# Altium PCB PIXRACER-R12.PcbDoc (part 2 of 2)
Units mm, origin at the board's own origin, x right, y up, seen from the top; angles counter-clockwise.
Board outline 36 x 36 mm, 4 copper layers (TOP, 2, 3, BOT), stack 1.492 mm thick; 137 components, 127 nets, 565 pads, 429 vias.
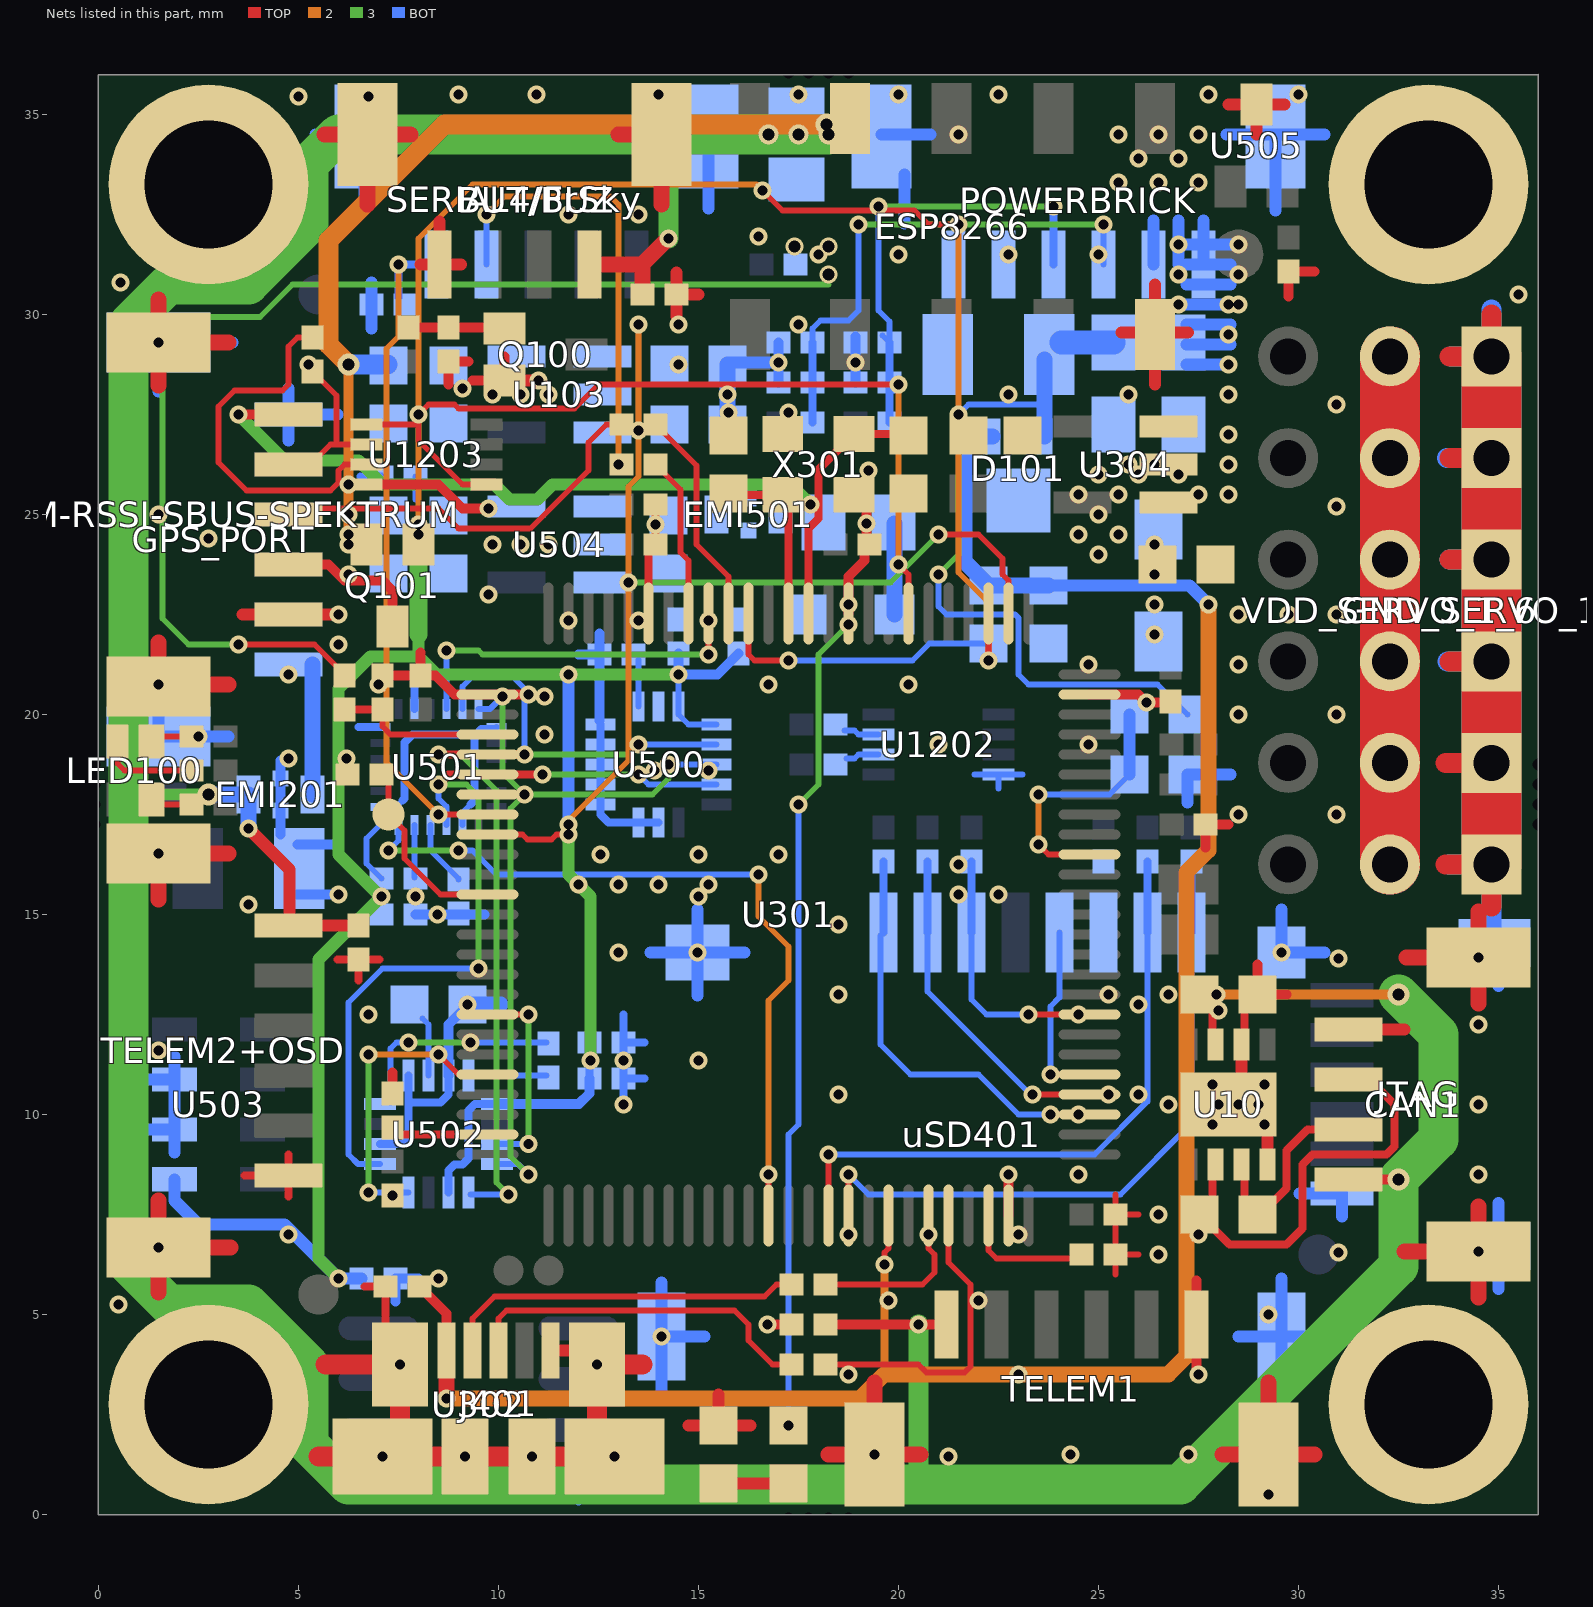
[diagram p4: the nets of this part, all layers, seen from the top]

## Via types
v1: diameter 0.45, hole 0.25, TOP to 2, tented both sides, 172 vias
v2: diameter 0.45, hole 0.25, 3 to BOT, tented bottom, 122 vias
v3: diameter 0.45, hole 0.25, TOP to BOT, tented both sides, 96 vias
v4: diameter 0.45, hole 0.25, TOP to 2, tented top, 10 vias
v5: diameter 0.45, hole 0.25, 3 to BOT, tented both sides, 9 vias
v6: diameter 0.45, hole 0.25, 3 to BOT, 6 vias
v7: diameter 0.45, hole 0.3, 3 to BOT, tented bottom, 3 vias
v8: diameter 0.45, hole 0.25, TOP to BOT, tented top, 3 vias
v9: diameter 0.5, hole 0.3, 3 to BOT, tented bottom, 3 vias
v10: diameter 0.55, hole 0.3, TOP to BOT, tented both sides, 3 vias
v11: diameter 0.55, hole 0.3, 3 to BOT, tented bottom, 1 vias
v12: diameter 0.55, hole 0.3, TOP to 2, tented top, 1 vias

## Nets (pads, with @x,y where several pads share a name; then routed paths per layer and width w, separated by ;. In a path a pad name is that pad's centre, name@x,y a point inside that pad or via, vN(x,y) a via of type N, cw(c..) or ccw(c..) an arc to the next point about the centre after c; other vN are vias at no path point) (continued)
GND: BUT/BUZ.GND C103.1 C105.1 C118.1 C119.1 C120.1 C301.1 C302.1 C303.1 C304.2 C305.2 C310.1 C311.1 C312.1 C313.1 C314.1 C315.1 C316.1 C317.1 C319.1 C320.1 C401.1 C402.2 C403.2 C404.1 C405.2 C501.1 C502.1 C503.1 C505.1 C508.1 C509.1 C510.1 C511.1 C520.1 C521.1 C523.1 C524.1 C525.1 C526.1 C601.2 C602.2 C603.2 CAN1.4 CAN1.GND EMI201.3 EMI201.4 EMI501.3 EMI501.4 ESP8266.2 G1.1 G2.1 G3.1 G4.1 GND_SERVO_1_6.1 GND_SERVO_1_6.2 GND_SERVO_1_6.3 GND_SERVO_1_6.4 GND_SERVO_1_6.5 GND_SERVO_1_6.6 GPS_PORT.6 GPS_PORT.GND J401.5 J401.6 J401.7 JTAG.6 JTAG.GND POWERBRICK.5 POWERBRICK.6 POWERBRICK.GND PPM-RSSI-SBUS-SPEKTRUM.5 PPM-RSSI-SBUS-SPEKTRUM.GND Q100.2 R104.1 R105.2 R118.1 R131.2 R140.1 R301.2 R302.1 R318.1 R404.2 R407.2 R408.2 R431.2 R502.1 SERIAL4/FrSky.4 SERIAL4/FrSky.GND TELEM1.6 TELEM1.GND TELEM2+OSD.6 TELEM2+OSD.GND TVS103.1 U10.2 U10.8 U10.EP U103.2 U301.10 U301.20 U301.27 U301.74 U301.99 U302.4 U304.2 U500.7 U500.8 U500.9 U500.10 U500.11 U500.12 U500.13 U500.15 U501.11 U501.18 U501.20 U502.6 U502.9 U502.11 U503.2 U503.3 U504.2 U505.3 U1202.4 U1203.4 uSD401.6 uSD401.GND X301.2 X301.4 | length 294.9
  TOP w0: 1.5,28.225 v4(1.5,29.3)
  TOP w0.15: 25.425,6 C311.1@25.425,7.5 ; C305.2@25.425,6.5 26,6.5 ; 25.425,8 C311.1@25.425,7.5 ; 26,7.5 C311.1@25.425,7.5
  TOP w0.2: 3.65,8.475 TELEM2+OSD.6@4.75,8.475 ; 4.75,7.95 TELEM2+OSD.6@4.75,8.475 ; 4.75,9 TELEM2+OSD.6@4.75,8.475 ; 5.975,13.875 C602.2@6.5,13.875 ; 6.5,13.35 C602.2@6.5,13.875 ; 6.65,5.7 C401.1@7.175,5.7 J401.6@7.175,4.7 ; 7.025,13.875 C602.2@6.5,13.875 ; U301.20@13.75,22.525 C316.1@13.75,24.1 ; C316.1@13.925,24.25 C315.1@13.925,25.25 ; U10.2@28.65,12.089 C404.1@28.65,12.6
  TOP w0.25: U1203.4@6.7,25.75 8.5,25.75 9.1,25.15 v1(9.75,25.15) ; R431.2@7.1,20.975 8.425,20.975 8.9,20.5 U301.27@9.725,20.5 v1(10.75,20.5) ; C304.2@7.35,10.525 7.35,11.05 ; C312.1@8.05,20.975 8.05,21.55 ; 8.75,28.25 R131.2@8.75,28.825 9.25,28.825 ; 9.35,28.35 Q100.2@10.15,28.35 ; Q100.2@10,28.35 Q100.2@10.15,28.35 ; 10.15,28.95 Q100.2@10.15,28.35 ; v1(16.725,4.75) C603.2@17.325,4.75 ; U301.10@18.75,22.525 18.75,23.45 19.15,23.85 C313.1@19.15,24 ; C313.1@19.2,24.45 X301.2@19.2,25.1 ; U301.74@22.75,7.475 v3@22.75,8.45 ; U301.99@24.775,20.5 26,20.5 v1(26.2,20.3) C310.1@26.8,20.3 ; 27.45,3.65 27.45,5.85 ; 27.675,16.675 R301.2@27.675,17.25 28.25,17.25 ; 28.975,13.75 C404.1@28.975,13 29.7,13 ; 29.75,30.45 C505.1@29.75,31.075 30.4,31.075
  TOP w0.3: 3.6,22.5 v1(6,22.5) ; 8.05,31.25 9.063,31.25 ; SERIAL4/FrSky.4@8.525,31.25 8.525,32.325 ; Q100.2@10.15,28.35 v1(11,28.35) ; J401.5@11.3,4.1 J401.6@12.112,4.1 ; v1@14.45,29.95 14.45,31.05 ; C601.2@14.45,30.5 15,30.5 ; 14.75,2.225 16.3,2.225 ; R140.1@15.5,2.225 15.5,3 ; 25.58,29.55 27.24,29.55 ; 26.41,28.25 ESP8266.2@26.41,29.5 26.41,30.75 ; 28.25,35.25 U505.3@28.95,35.25 ; U10.EP@28.575,10.575 U10.2@28.575,11.75 ; 28.95,34.5 U505.3@28.95,35.25 ; U10.8@29.225,8.75 U10.EP@29.225,9.55 ; 29.65,35.25 U505.3@28.95,35.25 ; CAN1.4@31.25,12.125 32.65,12.125
  TOP w0.4: 1.5,5.55 1.5,7.85 ; v1(1.5,6.675) 3.3,6.675 ; 1.5,15.375 v1(1.5,16.525) 3.25,16.525 ; 1.5,21.8 v4(1.5,20.75) 3.25,20.75 ; 1.5,28.225 v4(1.5,29.3) ; 1.5,30.375 v4(1.5,29.3) ; 3.25,29.3 v4(1.5,29.3) ; 5.65,34.5 SERIAL4/FrSky.GND@6.725,34.5 ; 6.725,32.75 SERIAL4/FrSky.GND@6.725,34.5 ; 7.8,34.5 SERIAL4/FrSky.GND@6.725,34.5 ; 13,34.5 SERIAL4/FrSky.GND@14.075,34.5 14.075,32.75 ; 18.25,1.5 v1(19.4,1.5) ; 19.4,3.3 v1(19.4,1.5) ; 20.55,1.5 v1(19.4,1.5) ; 28.1,1.5 TELEM1.GND@29.25,1.5 ; 29.25,3.3 TELEM1.GND@29.25,1.5 ; 30.4,1.5 TELEM1.GND@29.25,1.5 ; 32.65,6.575 v3(34.5,6.575) ; 32.7,13.925 v3(34.5,13.925) ; 34.5,5.425 34.5,7.7 ; 34.5,12.775 v3(34.5,13.925) ; 34.5,15.075 v3(34.5,13.925)
  TOP w0.5: 5.5,1.45 v1(12.9,1.45) ; 5.675,3.75 v1(7.538,3.75) J401.7@7.538,1.887 ; J401.7@12.462,1.887 v1(12.462,3.75) 13.6,3.75 ; 33.673,16.25 GND_SERVO_1_6.1@34.823,16.25 34.823,15.2 ; 33.673,18.79 GND_SERVO_1_6.2@34.823,18.79 ; 33.77,21.33 GND_SERVO_1_6.3@34.823,21.33 ; 33.77,23.87 GND_SERVO_1_6.4@34.823,23.87 ; 33.77,26.41 GND_SERVO_1_6.5@34.823,26.41 ; 33.77,28.95 GND_SERVO_1_6.6@34.823,28.95 34.823,30.003
  TOP w1.5: GND_SERVO_1_6.1@34.823,16.25 GND_SERVO_1_6.2@34.823,18.79 GND_SERVO_1_6.3@34.823,21.33 GND_SERVO_1_6.4@34.823,23.87 GND_SERVO_1_6.5@34.823,26.41 GND_SERVO_1_6.6@34.823,28.95
  3 w0.3: 33.75,16.25 GND_SERVO_1_6.1@34.823,16.25 34.823,15.177 ; 33.75,18.79 GND_SERVO_1_6.2@34.823,18.79 ; 33.75,21.33 GND_SERVO_1_6.3@34.823,21.33 ; 33.75,23.87 GND_SERVO_1_6.4@34.823,23.87 ; 33.75,26.41 GND_SERVO_1_6.5@34.823,26.41 ; 33.75,28.95 GND_SERVO_1_6.6@34.823,28.95 34.823,30.023
  3 w1.2: GND_SERVO_1_6.1@34.823,16.25 GND_SERVO_1_6.2@34.823,18.79 GND_SERVO_1_6.3@34.823,21.33 GND_SERVO_1_6.4@34.823,23.87 GND_SERVO_1_6.5@34.823,26.41 GND_SERVO_1_6.6@34.823,28.95
  2 w0.3: 33.746,16.25 GND_SERVO_1_6.1@34.823,16.25 34.823,15.173 ; 33.746,18.79 GND_SERVO_1_6.2@34.823,18.79 ; 33.746,21.33 GND_SERVO_1_6.3@34.823,21.33 ; 33.746,23.87 GND_SERVO_1_6.4@34.823,23.87 ; 33.746,26.41 GND_SERVO_1_6.5@34.823,26.41 ; 33.746,28.95 GND_SERVO_1_6.6@34.823,28.95 34.823,30.027
  2 w1.2: GND_SERVO_1_6.1@34.823,16.25 GND_SERVO_1_6.2@34.823,18.79 GND_SERVO_1_6.3@34.823,21.33 GND_SERVO_1_6.4@34.823,23.87 GND_SERVO_1_6.5@34.823,26.41 GND_SERVO_1_6.6@34.823,28.95
  BOT w0.15: C501.1@7.9,15.925 U501.11@7.9,17.241 ; 21.9,18.5 23.1,18.5 ; 22.5,18.15 U1202.4@22.5,18.5
  BOT w0.2: 6.5,19.691 U501.18@7.05,19.691 ; 6.55,25.95 R502.1@7.075,25.95 ; U502.6@7.039,9.259 7.609,9.259 7.75,9.4 U502.9@7.75,10.97 ; 7.75,10.3 8.55,10.3 8.75,10.5 U502.11@8.75,10.97 ; U501.20@7.9,20.141 7.9,20.75 ; U302.4@12.155,0.9 C301.1@13.4,0.9 ; U500.13@12.552,19.75 U500.12@12.552,19.25 U500.11@12.552,18.75 U500.10@12.552,18.25 U500.9@12.552,17.75 12.552,17.498 12.75,17.3 U500.7@14.002,17.3 ; v2(13.125,10.25) C521.1@13.125,10.9 ; 13.125,12.5 C520.1@13.125,11.8 ; 13.65,10.9 C521.1@13.125,10.9 ; 13.65,11.8 C520.1@13.125,11.8 ; C521.1@13.125,10.9 C520.1@13.125,11.8
  BOT w0.25: C320.1@4.55,17 EMI201.4@4.55,18.4 4.55,18.85 ; C320.1@4.97,15.5 v2(6,15.5) ; C320.1@4.97,16.75 5.85,16.75 ; 7.425,5.325 C508.1@7.425,5.9 8,5.9 ; C502.1@7.925,15 9.65,15 ; U502.11@8.75,10.97 8.75,12.25 C523.1@9.225,12.725 ; 12,0.35 U302.4@12,0.845 12,1.47 ; 12,21.5 C526.1@12.525,21.5 ; U500.13@12.525,19.85 C526.1@12.525,21.5 ; 12.525,22.025 C526.1@12.525,21.5 ; 13.6,0.45 C301.1@13.6,1.075 14.35,1.075 ; C405.2@17,28.3 R407.2@17,29.3 ; C403.2@18.925,28.3 R408.2@18.925,29.45
  BOT w0.3: 1.1,10.875 U503.3@1.9,10.875 ; 1.125,9.625 U503.2@1.9,9.625 ; 1.5,20.55 GPS_PORT.GND@1.5,19.45 3.25,19.45 ; 1.5,28.075 v4(1.5,29.3) ; 1.5,30.525 v4(1.5,29.3) ; 1.9,9.05 1.9,11.45 ; 3.35,29.3 v4(1.5,29.3) ; 4.75,26.85 4.75,28.15 ; GPS_PORT.6@4.75,27.5 5.975,27.5 ; 5.425,34.5 BUT/BUZ.GND@6.65,34.5 ; 6.65,32.7 BUT/BUZ.GND@6.65,34.5 ; 6.825,29.65 6.825,30.8 ; 7.875,34.5 BUT/BUZ.GND@6.65,34.5 ; 10.5,0.845 U302.4@12,0.845 ; 13.8,14.05 v2(14.977,14.05) ; 14.025,34.5 15.25,34.5 15.25,32.65 ; 14.077,2.95 v5(14.077,4.45) ; 14.077,5.798 v5(14.077,4.45) ; 14.977,12.977 v2(14.977,14.05) ; 14.977,15.123 v2(14.977,14.05) ; 15.15,4.45 v5(14.077,4.45) ; C118.1@15.8,28.8 v2(17,28.8) ; 16.154,14.05 v2(14.977,14.05) ; POWERBRICK.GND@19.575,34.5 20.8,34.5 ; 20.15,32.275 POWERBRICK.GND@20.15,33.5 ; POWERBRICK.5@26.375,31.25 26.375,32.35 ; 27,31.25 27,32.35 ; C103.1@27.2,28.75 28.3,28.75 ; C103.1@27.2,29.25 28.3,29.25 ; C103.1@27.2,29.75 28.3,29.75 ; v2@27.2,30.25 v2@28.3,30.25 ; 27.2,30.75 28.3,30.75 ; 27.2,31.25 28.3,31.25 ; v2@27.2,31.75 v2@28.3,31.75 ; 27.225,17.8 R105.2@27.225,18.5 28.298,18.5 ; POWERBRICK.6@27.625,31.25 27.625,32.35 ; 28.2,34.5 POWERBRICK.GND@29.425,34.5 ; 28.5,4.45 uSD401.GND@29.577,4.45 ; 29.425,32.6 POWERBRICK.GND@29.425,34.5 ; 29.577,2.9 uSD401.GND@29.577,4.45 ; 29.577,5.9 uSD401.GND@29.577,4.45 ; 29.577,15.123 v2(29.577,14.05) 30.65,14.05 ; 30.021,8.023 JTAG.6@31.094,8.023 31.094,7.45 ; 30.65,4.45 uSD401.GND@29.577,4.45 ; 30.65,34.5 POWERBRICK.GND@29.425,34.5 ; 33.7,6.715 JTAG.GND@35.006,6.715 ; 33.785,14.285 35.006,14.285 35.006,13.212 ; 35.006,5.642 JTAG.GND@35.006,6.715 ; 35.006,7.788 JTAG.GND@35.006,6.715
  BOT w0.4: v2(9.225,12.75) 10.05,12.75 ; R118.1@15.725,27.25 C118.1@15.725,28.75
  BOT w0.5: 33.71,18.79 GND_SERVO_1_6.2@34.823,18.79 ; 33.71,26.41 GND_SERVO_1_6.5@34.823,26.41 ; 33.72,21.33 GND_SERVO_1_6.3@34.823,21.33 ; 33.75,16.25 GND_SERVO_1_6.1@34.823,16.25 JTAG.GND@34.823,14.467 ; 33.77,23.87 GND_SERVO_1_6.4@34.823,23.87 ; 33.8,28.95 GND_SERVO_1_6.6@34.823,28.95 34.823,30.123
  BOT w1.5: GND_SERVO_1_6.1@34.823,16.25 GND_SERVO_1_6.2@34.823,18.79 GND_SERVO_1_6.3@34.823,21.33 GND_SERVO_1_6.4@34.823,23.87 GND_SERVO_1_6.5@34.823,26.41 GND_SERVO_1_6.6@34.823,28.95
  other v1: 7.1,1.45 9.165,1.45 10.835,1.45 21.25,1.45 24.3,1.5 27.25,1.5 31,6.55 4.75,7 7.35,7.975 27.85,9.75 29.15,9.75 28.5,10.25 26,10.5 27.85,10.75 29.15,10.75 1.5,11.6 26,12.75 21.5,15.5 22.5,15.5 12,15.75 13,15.75 14,15.75 15.25,15.75 21.5,16.25 13.9,18.6 15.25,18.6 4.75,18.9 6.2,18.9 28.5,20 4.75,21 28.5,21.25 26.4,22 28.5,22.5 29.75,22.5 26.4,22.75 9.75,23 26.4,23.5 26.4,24.25 13.925,24.75 19.2,24.775 1.5,25 19.25,26.1 25.75,26.25 26.4,26.25 15.75,27.55 17.25,27.55 22.75,28 25.75,28 28.25,28 9.1,28.15 14.5,28.75 28.25,28.75 28.25,29.5 14.5,29.75 17.5,29.75 28.25,30.25 18,31.5 20,31.5 22.75,31.5 25,31.5 11.75,32.5 13.5,32.5 17.5,35.5 20,35.5
  other v2: 18.75,3.5 23,3.5 27.5,3.5 19.75,5.35 22,5.35 8.5,5.9 18.75,7 20.75,7 23,7 27.5,7 24.5,10 28,10.25 29,10.25 25.25,10.5 13.125,11.35 15,11.35 24.5,12.5 28,12.6 18.5,13 13,14.05 18.5,14.75 8.475,15 3.75,15.25 7.925,15.45 15,15.45 12.55,16.5 15,16.5 17,16.5 21,19.25 24.75,19.25 2.5,19.45 11.15,19.5 11.15,20.45 7,20.75 16.75,20.75 20.25,20.75 24.75,21.25 6,21.75 11.75,22.35 13.5,22.35 15.25,22.35 6.25,23.5 6.25,24.25 9.85,24.25 10.55,24.25 11.25,24.25 2.75,24.4 6.25,25 6.25,25.75 8,27.5 9.85,28 10.55,28 11.25,28 15.725,28 5.25,28.75 18.925,28.8 27,30.25 28.5,30.25 27,31 28.5,31 27,31.75 28.5,31.75 25.5,33.3 26.5,33.3 27.5,33.3 26,33.9 27,33.9 21.5,34.5 25.5,34.5 26.5,34.5 27.5,34.5
  other v3: 29.25,0.5 29.25,5 0.5,5.25 26.5,6.5 26.5,7.5 22.75,8.5 34.5,8.5 34.5,10.25 34.5,12.25 6.75,12.5 31,13.9 28.5,17.5 30.95,17.5 30.95,20 30.95,22.5 30.95,25.2 30.95,27.75 35.5,30.5 0.55,30.8 5,35.45 6.75,35.45 9,35.5 10.95,35.5 14,35.5 22.5,35.5 27.75,35.5 30,35.5
  other v5: 24.5,8.5 26.75,10.25 18.5,10.5 25.25,13 26.75,13
HMC5983_CS: U301.46 U502.4 | length 7.6
  TOP w0.15: v1(8.5,11.5) 9,11 U301.46@9.725,11
  3 w0.15: v6(6.75,8.049) v3(6.75,11.5)
  2 w0.15: v3(6.75,11.5) v1(8.5,11.5)
  BOT w0.15: v6(6.75,8.049) U502.4@7.75,8.049
HMC5983_DRDY: U301.43 U502.15 | length 5.1
  TOP w0.15: U301.43@9.725,12.5 v3(10.75,12.5)
  3 w0.15: v6(10.75,9.259) v3(10.75,12.5)
  BOT w0.15: U502.15@9.96,9.259 v6(10.75,9.259)
LED_SAFETY: R403.2 U301.18 | length 4.1
  TOP w0.15: R403.2@13.925,26.25 14.55,25.625 14.55,24.05 14.75,23.85 U301.18@14.75,22.525
MPU9250_CS: U301.17 U501.22 | length 9.1
  TOP w0.15: v3(15.25,21.5) U301.17@15.25,22.525
  3 w0.15: v8(8.7,21.6) 9.5,21.6 9.6,21.5 v3(15.25,21.5)
  BOT w0.15: U501.22@8.7,20.141 v8(8.7,21.6)
MPU9250_DRDY: U301.62 U501.12 | length 19.3
  TOP w0.15: U301.62@16.75,7.475 v1(16.75,8.5)
  3 w0.15: v2(7.25,16.6) v6(9,16.6)
  2 w0.15: v3(16.5,16) 16.5,14.95 17.25,14.2 17.25,13.35 16.75,12.85 v1(16.75,8.5)
  BOT w0.15: v2(7.25,16.6) 7.5,16.85 U501.12@7.5,17.241 ; v6(9,16.6) 9.35,16.6 9.95,16 v3(16.5,16)
MPU9250_MISO: U301.31 U500.4 U501.9 U502.5 | length 22
  TOP w0.2: v3(8.5,18.25) 8.75,18.5 v3(11.1,18.5)
  3 w0.15: v3(8.5,18.25) 9.2,18.25 9.5,17.95 v6(9.5,13.65) ; v3(11.1,18.5) v2(13.5,18.5)
  BOT w0.15: U502.5@7.039,8.759 6.491,8.759 6.25,9 6.25,12.8 7.1,13.65 v6(9.5,13.65) ; v3(8.5,18.25) 8.5,17.9 8.7,17.7 U501.9@8.7,17.241 ; v2(13.5,18.5) 13.75,18.25 U500.4@15.452,18.25
MPU9250_MOSI: U301.32 U500.3 U501.24 U502.16 | length 20.4
  TOP w0.15: U301.32@9.725,18 v3(10.65,18)
  3 w0.15: v2(10.1,20.45) 10.1,18.55 v3(10.65,18) ; v6(10.75,8.5) 10.3,8.95 10.3,17.65 v3(10.65,18) ; v2(14.25,18.75) 14.25,18.4 13.85,18 v3(10.65,18)
  BOT w0.15: U501.24@9.5,20.141 9.791,20.141 v2(10.1,20.45) ; U502.16@9.96,8.759 10.491,8.759 v6(10.75,8.5) ; v2(14.25,18.75) U500.3@15.452,18.75
MPU9250_SCK: U301.30 U500.2 U501.23 U502.1 | length 24
  TOP w0.2: v3(8.5,19) v3(10.65,19)
  3 w0.15: v3(8.5,19) 9.05,19 9.95,18.1 9.95,8.3 v6(10.25,8) ; v3(10.65,19) 13.25,19 v2(13.5,19.25)
  BOT w0.15: U501.23@9.1,20.141 9.1,20.7 9.35,20.95 10.35,20.95 10.65,20.65 v3(10.65,19) ; U502.1@9.3,8 v6(10.25,8) ; v2(13.5,19.25) U500.2@15.452,19.25
NetBOOT1_1: BOOT1.1 R302.2 U301.37 | length 4.5
  TOP w0.15: R302.2@7.25,18.325 BOOT1.1@7.25,17.5 7.65,17.1 7.65,16.4 8.55,15.5 U301.37@9.725,15.5
NetBUT/BUZ_2: BUT/BUZ.2 R403.1 | length 11.3
  2 w0.15: v3(9.7,32.5) 10.15,32.95 12.8,32.95 13,32.75 v1(13,26.25)
  BOT w0.15: BUT/BUZ.2@9.7,31.25 v3(9.7,32.5)
NetC103_2: C103.2 D101.1 FR102.2 R103.1 | length 18.7
  3 w0.15: v2(21,23.5) 21.5,24 v2(21.5,27.5)
  BOT w0.15: v2(21,23.5) 21,22.7 21.2,22.5 22.916,22.5 23,22.416 23,21 23.25,20.75 26.475,20.75 R103.1@27.225,20 ; v2(21.5,27.5) 21.75,27.75 23.65,27.75
  BOT w0.4: D101.1@23.65,26.95 23.65,27.75 FR102.2@23.65,28.88
  BOT w0.6: FR102.2@24.07,29.3 C103.2@25.375,29.3
NetC304_1: C304.1 U301.49 | length 2.5
  TOP w0.2: C304.1@7.25,9.5 U301.49@9.725,9.5
NetC305_1: C305.1 U301.73 | length 3.2
  TOP w0.15: U301.73@22.25,7.475 22.25,6.6 22.45,6.4 C305.1@24.475,6.4
NetC403_1: C403.1 POWERBRICK.3 R408.1 R422.2 | length 11.9
  3 w0.15: v2(19.5,32.7) v2(23.875,32.7)
  BOT w0.15: v2(19.5,32.7) 19.5,30.1 19.775,29.825 19.775,29 ; R408.1@19.6,29.475 R408.1@19.775,29.3
  BOT w0.2: R422.2@19.775,27.3 C403.1@19.775,28.3 R408.1@19.775,29.3 ; POWERBRICK.3@23.875,31.25 v2(23.875,32.7)
NetC405_1: C405.1 POWERBRICK.4 R407.1 R423.2 | length 13.3
  3 w0.15: v2(19,32.25) v2(25.125,32.25)
  BOT w0.15: 17.85,29 17.85,29.65 18.05,29.85 18.75,29.85 19,30.1 v2(19,32.25) ; POWERBRICK.4@25.125,31.25 v2(25.125,32.25)
  BOT w0.2: R423.2@17.85,27.3 C405.1@17.85,28.3 R407.1@17.85,29.3
NetC503_2: C503.2 U501.10 | length 1.7
  BOT w0.15: U501.10@8.3,17.241 8.3,16.6 9,15.9 C503.2@9,15.875
NetC509_2: C509.2 EMI501.2 U504.1
NetC522_1: C522.1 U502.12 | length 2
  BOT w0.15: U502.12@9.25,10.97 C522.1@11.205,10.97
NetC522_2: C522.2 U502.8 | length 5.3
  3 w0.15: v2(7.75,11.8) v2(9.3,11.8)
  BOT w0.15: U502.8@7.3,10.3 7.3,11.65 7.45,11.8 v2(7.75,11.8) ; v2(9.3,11.8) C522.2@11.2,11.8
NetC523_2: C523.2 U502.10 | length 1.5
  BOT w0.15: C523.2@8.1,12.4 8.25,12.25 U502.10@8.25,10.97
NetC526_2: C526.2 U500.14 | length 1.2
  BOT w0.15: U500.14@13.502,20.2 C526.2@13.502,21.373
NetCAN1_2: CAN1.2 R405.1 U10.7 | length 3.8
  TOP w0.2: R405.1@28.65,7.939 U10.7@28.65,8.45 ; R405.1@29.3,7.75 29.7,8.15 29.7,9.1 30.225,9.625 CAN1.2@31.25,9.625
NetCAN1_3: CAN1.3 R405.2 U10.6 | length 9.3
  TOP w0.2: R405.2@27.525,7.5 28.275,6.75 29.7,6.75 30.1,7.15 30.1,8.75 30.35,9 32.2,9 32.4,9.2 32.4,10.25 CAN1.3@31.95,10.7 ; R405.2@27.85,7.939 U10.6@27.85,8.45
NetD102_2: D102.2 FR106.1 | length 2.3
  BOT w0.4: D102.2@19.9,22.5 FR106.1@19.9,24.775
NetD301_1: D301.1 R319.2 | length 0.9
  BOT w0.2: R319.2@0.7,17.075 D301.1@0.7,18
NetEMI201_2: EMI201.2 GPS_PORT.1 | length 3.3
  BOT w0.4: EMI201.2@5.35,18 GPS_PORT.1@5.35,21.25
NetJ401_2: J401.2 R441.1 | length 9.1
  TOP w0.15: J401.2@9.35,4.1 9.35,4.9 9.9,5.45 16.65,5.45 16.95,5.75 R441.1@17.325,5.75
NetJ401_3: J401.3 R442.1 | length 9
  TOP w0.15: J401.3@10,4.1 10,4.9 10.2,5.1 15.9,5.1 16.25,4.75 16.25,4.35 16.85,3.75 R442.1@17.325,3.75
NetLED100_1: LED100.1 R115.2 | length 2.5
  TOP w0.15: LED100.1@0.475,19.325 0.475,18.775 0.65,18.6 R115.2@2.325,18.6
NetLED100_2: LED100.2 R114.2 | length 0.9
  TOP w0.15: LED100.2@1.45,19.45 R114.2@2.325,19.45
NetLED100_3: LED100.3 R113.2 | length 0.9
  TOP w0.15: LED100.3@1.45,17.75 R113.2@2.325,17.75
"NetPOWER LED_2": "POWER LED.2" R140.2 | length 1.8
  TOP w0.3: R140.2@15.5,0.775 17.25,0.775
NetPPM-RSSI-SBUS-SPEKTRUM_3: PPM-RSSI-SBUS-SPEKTRUM.3 R201.1 | length 10.1
  TOP w0.15: PPM-RSSI-SBUS-SPEKTRUM.3@4.75,25 5.3,25 5.45,25.15 8.5,25.15 9,24.65 10.8,24.65 12.25,26.1 12.25,26.8 12.7,27.25 R201.1@13.075,27.25
NetQ100_3: Q100.3 R130.1 R131.1 | length 2.4
  TOP w0.25: R130.1@7.75,29.675 R131.1@8.75,29.675 Q100.3@10.125,29.675
NetR200_1: R200.1 U1203.3 | length 9.5
  TOP w0.15: R200.1@5.35,29.425 4.975,29.425 4.75,29.2 4.75,28.25 4.6,28.1 3.4,28.1 3,27.7 3,26.3 3.7,25.6 5.8,25.6 6,25.8 6,26.1 6.15,26.25 U1203.3@6.7,26.25
NetR452_2: R452.2 U1202.7 | length 0.9
  BOT w0.15: R452.2@18.65,19.6 18.9,19.6 19,19.5 U1202.7@19.5,19.5
NetR454_2: R454.2 U1202.6 | length 0.8
  BOT w0.15: R454.2@18.7,18.9 18.9,18.9 19,19 U1202.6@19.5,19
OSC_IN: C302.2 U301.12 X301.3 | length 6.3
  TOP w0.2: U301.12@17.75,22.525 17.75,24.65 18,24.9 18,26.123 X301.3@18.889,27.012 C302.2@20.213,27.012
OSC_OUT: C303.2 U301.13 X301.1 | length 4.1
  TOP w0.2: C303.2@15.787,25.488 X301.1@17.111,25.488 ; U301.13@17.25,22.525 X301.1@17.25,25.349
OTG_FS_DM: R441.2 U301.70 | length 4.3
  TOP w0.15: R441.2@18.175,5.75 20.6,5.75 20.9,6.05 20.9,6.5 20.75,6.65 U301.70@20.75,7.475
OTG_FS_DP: R442.2 U301.71 | length 7.8
  TOP w0.15: R442.2@18.175,3.75 20.5,3.75 20.7,3.55 21.65,3.55 21.8,3.7 21.8,5.75 21.25,6.3 U301.71@21.25,7.475
RC_INPUT: PPM-RSSI-SBUS-SPEKTRUM.2 R200.2 U1203.2 | length 3.7
  TOP w0.15: PPM-RSSI-SBUS-SPEKTRUM.2@5.3,26.25 5.8,26.75 5.95,26.75 ; R200.2@5.35,28.575 5.95,27.975 5.95,26.75 ; U1203.2@6.7,26.75 5.95,26.75
RSSI_IN: R201.2 U301.16 | length 5.5
  TOP w0.15: R201.2@13.925,27.25 14.95,26.225 14.95,24.25 15.75,23.45 U301.16@15.75,22.525
SAFETY_SWITCH_IN: BUT/BUZ.1 R404.1 U301.33 | length 17.4
  TOP w0.15: v1(8.5,17.5) U301.33@9.725,17.5
  2 w0.15: v3(7.5,31.25) 7.5,29.45 7.2,29.15 7.2,18.8 v1(8.5,17.5)
  BOT w0.2: R404.1@7.5,30.425 v3(7.5,31.25) BUT/BUZ.1@8.45,31.25
SBUS_INV: U301.7 U1203.1 U1203.5 | length 22.3
  TOP w0.15: U1203.1@6.7,27.25 8,27.25 ; U1203.5@9.7,25.75 9.1,25.75 8,26.85 8,27.5 8.25,27.75 8.9,27.75 9,27.65 11.9,27.65 12.5,28.25 v1(20,28.25) ; v1(20,23.75) 20.25,23.5 U301.7@20.25,22.525
  2 w0.15: v1(20,23.75) v1(20,28.25)
SDIO_CK: U301.80 uSD401.5 | length 4.6
  TOP w0.15: v3(23.8,11) U301.80@24.775,11
  BOT w0.15: v3@23.75,11 23.8,11.05 23.8,12.7 24.027,12.927 uSD401.5@24.027,14.55
SDIO_CMD: R411.1 U301.83 uSD401.3 | length 6.6
  TOP w0.15: v3(23.25,12.5) U301.83@24.775,12.5
  BOT w0.15: uSD401.3@21.827,14.55 21.827,12.873 22.2,12.5 v3(23.25,12.5)
  BOT w0.2: uSD401.3@21.827,14.55 R411.1@21.827,16.325
SDIO_D0: R410.1 U301.65 uSD401.7 | length 16
  TOP w0.15: U301.65@18.25,7.475 v3(18.25,9)
  BOT w0.15: v3(18.25,9) 22.9,9 24.9,9 26.227,10.327 uSD401.7@26.227,14.55
  BOT w0.2: uSD401.7@26.227,14.55 R410.1@26.227,16.325
SDIO_D1: R401.1 U301.66 uSD401.8 | length 17.1
  TOP w0.15: U301.66@18.75,7.475 v3(18.75,8.5)
  BOT w0.15: v3(18.75,8.5) 19.25,8 25.55,8 27.327,9.777 uSD401.8@27.327,14.55
  BOT w0.2: uSD401.8@27.327,14.55 R401.1@27.327,16.325
SDIO_D2: R413.1 U301.78 uSD401.1 | length 10.6
  TOP w0.15: v3(23.8,10) U301.78@24.775,10
  BOT w0.15: uSD401.1@19.627,14.55 19.55,14.473 19.55,11.75 20.3,11 22,11 23,10 v3(23.8,10)
  BOT w0.2: uSD401.1@19.627,14.55 R413.1@19.627,16.325
SDIO_D3: R412.1 U301.79 uSD401.2 | length 8.3
  TOP w0.15: v3(23.35,10.5) U301.79@24.775,10.5
  BOT w0.15: uSD401.2@20.727,14.55 20.727,13.073 23.25,10.55 v3@23.25,10.5
  BOT w0.2: uSD401.2@20.727,14.55 R412.1@20.727,16.325
SPEKTRUM_POWER: Q101.3 U301.3 | length 34.3
  TOP w0.15: v1(16.6,33.1) 17.1,32.6 20.4,32.6 20.75,32.25 v1(21.5,32.25) ; v1(22.25,21.35) U301.3@22.25,22.525
  2 w0.15: v1(8,24.5) 8,31.9 9.35,33.25 16.45,33.25 v1(16.6,33.1) ; v1(21.5,32.25) 21.5,23.55 22.25,22.8 v1(22.25,21.35)
VBUS: C401.2 D101.2 J401.1 R102.2 R104.2 U301.68 | length 55.3
  TOP w0.15: v4(19.65,6.25) 19.65,6.55 19.75,6.65 U301.68@19.75,7.475
  TOP w0.25: C401.2@8.025,5.7 8.7,5.025 J401.1@8.7,4.1
  TOP w0.4: v1(8.7,2.9) J401.1@8.7,4.1
  2 w0.2: 19.65,3.5 v4(19.65,6.25)
  2 w0.4: v1(8.7,2.9) 19.05,2.9 19.65,3.5 26.75,3.5 27.2,3.95 27.2,16.05 27.75,16.6 v3(27.75,22.75)
  BOT w0.3: R104.2@23.75,23.225 27.275,23.225 v3(27.75,22.75)
  BOT w0.4: D101.2@22.35,26.95 21.95,26.95 21.65,26.65 21.65,23.825 R102.2@22.25,23.225 R104.2@23.75,23.225
VBUS_VALID: R102.1 U301.15 | length 7.3
  TOP w0.15: U301.15@16.25,22.525 16.25,21.5 16.4,21.35 v3(17.25,21.35)
  BOT w0.15: v3(17.25,21.35) 20.35,21.35 20.775,21.775 R102.1@22.25,21.775
VDD_3V3_PERIPH: C119.2 C120.2 ESP8266.7 Q101.2 U103.5 | length 22.2
  2 w0.25: v1(6.25,24.5) v10(6.25,28.75)
  2 w0.5: v10(6.25,28.75) 5.75,29.25 5.75,31.85 8.65,34.75 v12(18.2,34.75)
  BOT w0.5: v10(6.25,28.75) C119.2@7.228,28.75
VDD_3V3_PERIPH_EN: R118.2 U103.3 U301.34 | length 18.3
  TOP w0.15: U301.34@9.725,17 10.6,17 10.725,16.875 11.325,16.875 11.45,17 v1(11.75,17)
  3 w0.15: v2(13.5,27.1) v3(13.5,29.75)
  2 w0.15: v1(11.75,17) 11.75,17.35 13.25,18.85 13.25,25.7 13.5,25.95 v3(13.5,29.75)
VDD_3V3_SENSORS: C501.2 C502.2 C508.2 C510.2 C511.2 C520.2 C521.2 C524.2 C525.2 R502.2 U500.1 U500.16 U501.1 U501.8 U501.13 U502.2 U502.13 U503.1 U504.5 | length 65.1
  3 w0.3: v2(6,5.9) 5.5,6.4 5.5,13.875 v2(7.075,15.45) 7.05,15.45 6,16.5 6,20.65 6.8,21.45 8,21.45 ; 8,22 8,21.45 ; v5(11.75,17.25) 11.75,16 12.3,15.45 v2(12.3,11.35) ; v2(14.5,21) v2(11.75,21) 8.45,21 8,21.45
  3 w0.45: 8,22 v2(8,24.75)
  BOT w0.15: C501.2@7.075,15.9 6.7,16.275 6.7,16.9 7.05,17.25 U501.13@7.05,17.691 7.075,17.716 7.466,17.716 7.6,17.85 ; 7.925,25.375 R502.2@7.925,25.95 ; U501.8@9.1,17.241 9.1,17.55 9.3,17.75 ; 9.4,19.5 9.566,19.666 9.925,19.666 U501.1@9.95,19.691 ; v2(14.5,21) 14.5,20 14.75,19.75 U500.1@15.452,19.75 ; C525.2@14.5,21.525 C525.2@14.5,21.525
  BOT w0.2: 7.6,17.85 7.65,17.9 7.65,19.3 7.85,19.5 9.4,19.5 9.4,17.85 9.3,17.75 ; U502.2@8.75,8.049 8.75,8.6 8.9,8.75 9.1,8.75 9.25,8.9 9.25,10.1 9.409,10.259 U502.13@9.96,10.259 ; C521.2@12.275,10.9 C520.2@12.275,11.8 C520.2@12.275,11.9
  BOT w0.25: U502.13@9.96,10.259 12.009,10.259 12.275,10.525 C521.2@12.275,10.9 ; C525.2@14.5,21.525 v2(14.5,21) 15.475,21 C524.2@16,21.525
  BOT w0.3: U503.1@1.9,8.375 1.9,7.85 2.5,7.25 4.65,7.25 v2(6,5.9) C508.2@6.575,5.9 ; v5(11.75,17.25) v2(11.75,21)
VDD_3V3_SENSORS_EN: U301.2 U504.3 | length 11.5
  TOP w0.15: v3(21,24.5) 22,24.5 22.6,23.9 22.6,23.5 22.75,23.35 U301.2@22.75,22.525
  3 w0.15: v2(13.25,23.3) 19.8,23.3 v3(21,24.5)
VDD_3V3_SPEKTRUM: PPM-RSSI-SBUS-SPEKTRUM.4 Q101.1 | length 3.8
  TOP w0.25: PPM-RSSI-SBUS-SPEKTRUM.4@4.75,23.75 5.75,23.75 6.15,23.35 7.1,23.35 7.35,23.1 Q101.1@7.35,22.2
VDD_5V_BRICK: FR102.1 POWERBRICK.1 POWERBRICK.2
VDD_5V_IN: "POWER LED.1" C105.2 C118.2 C317.2 D101.3 D102.1 EMI501.1 FR101.1 R132.2 R430.2 TVS103.2 U103.1 U304.1 U304.3 | length 50
  TOP w0.15: v3(3.5,21.75) 5.4,21.75 6.15,21 R430.2@6.15,20.975
  3 w0.15: v3(3.5,21.75) 2.25,21.75 1.6,22.4 1.6,29.45 2.087,29.937 4.038,29.937 4.85,30.75 18.25,30.75 ; v5(17.5,17.75) 18,18.25 18,21.5 v2(18.75,22.25)
  BOT w0.15: v3(17.25,2.225) 17.25,9.5 17.5,9.75 v5(17.5,17.75)
  other v2: 18.75,22.75 25,24 24.5,24.5 25.5,24.5 25,25 24.5,25.5 25.5,25.5 27.5,25.5 25,26 26,26 27,26
  other v3: 28.25,25.5 28.25,26.25 28.25,27 16.5,31.95
  other v7: 18.25,31 17.4,31.7 18.25,31.7
VDD_5V_PERIPH: C404.2 C601.1 C602.1 C603.1 CAN1.1 EMI201.1 FR101.2 SERIAL4/FrSky.1 TELEM1.1 TELEM2+OSD.1 U10.3 | length 116.1
  TOP w0.2: U10.3@27.85,12.05 C404.2@27.85,12.561
  TOP w0.25: C603.1@18.175,4.75 v3(20.5,4.75) TELEM1.1@21.2,4.75 ; CAN1.1@31.25,8.375 v10(32.5,8.375)
  TOP w0.3: v3(3.75,17.15) 4.775,16.125 TELEM2+OSD.1@4.775,14.75 ; TELEM2+OSD.1@4.75,14.725 C602.1@6.4,14.725
  TOP w0.4: SERIAL4/FrSky.1@12.275,31.25 13.6,31.25 ; C601.1@13.6,30.5 13.6,31.25 ; v3(14.25,31.9) 13.6,31.25
  3 w0.3: 0.8,18 v11(2.75,18)
  3 w0.5: v3(14.25,31.9) 14.25,34.25 ; 20.5,0.5 v3(20.5,4.75)
  3 w1: v9(18.25,34.5) 6,34.5 5.25,33.75 5.25,32.25 3.75,30.75 1.75,30.75 0.75,29.75 0.75,6.25 1.75,5.25 3.75,5.25 5.25,3.75 5.25,1.75 6.25,0.75 27.05,0.75 32.5,6.2 v10(32.5,8.375) 33.5,9.375 33.5,12 v10(32.5,13)
  2 w0.25: v1(27.95,13) v10(32.5,13)
  BOT w0.4: v11(2.75,18) EMI201.1@3.75,18 v3(3.75,17.15)
  other v9: 16.75,34.5 17.5,34.5
VDD_5V_RECEIVER: FR106.2 PPM-RSSI-SBUS-SPEKTRUM.1 | length 16.8
  TOP w0.25: v3(3.5,27.5) PPM-RSSI-SBUS-SPEKTRUM.1@4.75,27.5
  3 w0.3: v3(3.5,27.5) 4.65,26.35 6.5,26.35 7.1,25.75 9.9,25.75 10.275,25.375 10.975,25.375 11.35,25.75 17.3,25.75 v2(17.8,25.25)
VDD_5V_SENS: R430.1 R431.1 U301.29 | length 4.1
  TOP w0.15: R431.1@7.1,20.125 7.1,19.7 7.3,19.5 U301.29@9.725,19.5
  TOP w0.2: R430.1@6.15,20.125 R431.1@7.1,20.125
VDD_BRICK_VALID: R103.2 R105.1 U301.91 | length 6.6
  TOP w0.15: v1(23.5,16.75) 23.75,16.5 U301.91@24.775,16.5
  2 w0.15: v1(23.5,16.75) v3(23.5,18)
  BOT w0.15: v3(23.5,18) 25.275,18 R105.1@25.775,18.5
  BOT w0.3: R105.1@25.775,18.5 R103.2@25.775,20
VDD_SERVO: VDD_SERVO_1_6.1 VDD_SERVO_1_6.2 VDD_SERVO_1_6.3 VDD_SERVO_1_6.4 VDD_SERVO_1_6.5 VDD_SERVO_1_6.6 | length 50.8
  TOP w1.5: VDD_SERVO_1_6.1@32.283,16.25 VDD_SERVO_1_6.2@32.283,18.79 VDD_SERVO_1_6.3@32.283,21.33 VDD_SERVO_1_6.4@32.283,23.87 VDD_SERVO_1_6.5@32.283,26.41 VDD_SERVO_1_6.6@32.283,28.95
  3 w1.2: VDD_SERVO_1_6.1@32.283,16.25 VDD_SERVO_1_6.2@32.283,18.79 VDD_SERVO_1_6.3@32.283,21.33 VDD_SERVO_1_6.4@32.283,23.87 VDD_SERVO_1_6.5@32.283,26.41 VDD_SERVO_1_6.6@32.283,28.95
  2 w1.2: VDD_SERVO_1_6.1@32.283,16.25 VDD_SERVO_1_6.6@32.283,28.95
  BOT w1.5: VDD_SERVO_1_6.1@32.283,16.25 VDD_SERVO_1_6.2@32.283,18.79 VDD_SERVO_1_6.3@32.283,21.33 VDD_SERVO_1_6.4@32.283,23.87 VDD_SERVO_1_6.5@32.283,26.41 VDD_SERVO_1_6.6@32.283,28.95
pads on no net: J401.4 p2.1 p3.1 p4.1 U103.4 U304.4 U501.2 U501.3 U501.4 U501.5 U501.6 U501.7 U501.14 U501.15 U501.16 U501.17 U501.19 U501.21 U502.3 U502.7 U502.14 U503.4 U504.4 uSD401.9

## Polygon pours and split planes (outlines as drawn)
VDD_3V3_PERIPH on BOT "TOP-No Net" (solid, pour order 47): 11.2,29.25 11.2,28.5 9.6,28.5 9.5,28.4 9.5,28.25 6.75,28.25 6.75,29.25
GND on BOT "TOP-No Net" (solid, pour order 50): 13.35,28.3 9.7,28.3 9.7,28.15 9.55,28 6.75,28 6.75,26.75 9.5,26.75 9.5,27.35 9.7,27.55 11.65,27.55 11.8,27.7 13.35,27.7
VDD_3V3_SENSORS on BOT "TOP-No Net" (solid, pour order 48): 11.2,25.5 11.2,24.9 9.65,24.9 9.25,24.5 6.75,24.5 6.75,25.5
GND on BOT "TOP-No Net" (solid, pour order 45): 6.75,24.3 9.35,24.3 9.75,24.7 13.35,24.7 13.35,23.8 9.65,23.8 9.5,23.65 9.5,23 6.75,23
VDD_5V_PERIPH on BOT "BOT-No Net" (solid, remove dead copper, pour order 33): 16.5,35.75 18.5,35.75 18.5,34.25 16.5,34.25 16.5,35.75
GND on BOT "BOT-No Net" (solid, remove dead copper, pour order 35): 0,36 36,36 36,-0.003 0,-0.003 0,36
GND on BOT "BOT-No Net" (solid, remove dead copper, pour order 30): 16.5,25.6 16,25.6 16,24.4 15.9,24.3 15,24.3 15,22.9 14.9,22.8 11.85,22.8 11.85,22 16.5,22
NetC509_2 on BOT "TOP-No Net" (solid, pour order 46): 11.85,24.9 13.6,24.9 14,24.5 15.75,24.5 15.75,25.5 11.85,25.5
VDD_5V_IN on BOT "BOT-No Net" (solid, remove dead copper, pour order 43): 16.5,34 18.6,34 18.6,30.15 17.9,30.15 17.6,29.85 16,29.85 16,30.75 16.95,30.75 17.1,30.9 17.1,31.65 17,31.75 16.5,31.75
VDD_5V_IN on BOT "BOT-No Net" (solid, pour order 39): 11.85,29.25 11.85,28.5 13.8,28.5 13.8,28.3 15,28.3 15,29.35 15.15,29.5 16.15,29.5 16.5,29.85 16.5,30.75 14,30.75 14,29.5 13.75,29.25
VDD_3V3_PERIPH_EN on BOT "BOT-No Net" (solid, remove dead copper, pour order 26): 11.85,27.35 11.85,26.75 14.7,26.75 14.7,27.35 11.85,27.35
VDD_5V_BRICK on BOT "BOT-No Net" (solid, remove dead copper, pour order 29): 22.95,32.1 22.95,30.4 22.75,30.2 22.75,29.5 22.75,28 20.6,28 20.6,31.65 21.05,32.1 22.95,32.1
VDD_5V_IN on BOT "BOT-No Net" (solid, remove dead copper, pour order 27): 17.35,25.5 16.75,25.5 16.75,22 19,22 19,23.85 17.5,23.85 17.35,24
GND on BOT "BOT-No Net" (solid, remove dead copper, pour order 32): 27.7,26.55 26.3,26.55 26.3,30.15 26.05,30.4 25.75,30.4 26.05,30.4 26.05,32.1 28,32.1 28,28.35 27.7,28.05 27.7,26.55
VDD_5V_IN on BOT "BOT-No Net" (solid, remove dead copper, pour order 28): 26,28 24.65,28 24.65,27.9 24.5,27.75 24.25,27.75 24.25,26.4 24,26.15 22.2,26.15 22.2,24 24.25,24 24.5,23.75 24.5,23.55 29.75,23.55 29.75,28 28,28 28,26.5 27.75,26.25 26.25,26.25 26,26.5
FMU_VDD_3V3 on TOP "BOT-No Net" (solid, remove dead copper, pour order 41): 10.75,20.75 10.9,20.9 12,20.9 12.6,21.5 23.4,21.5 23.65,21.75 24.15,21.75 24.15,21.35 24,21.2 24,20.8 23.05,19.85 23.05,19.05 16.55,19.05 16.55,19.7 10.75,19.7
FMU_VDD_3V3 on TOP "BOT-No Net" (solid, remove dead copper, pour order 40): 10.75,9.2 13.5,9.2 14.2,8.5 23.75,8.5 23.75,14.75 11.5,14.75 11.5,13.75 12.25,13 20,13 20,10.25 10.75,10.25
GND on TOP "TOP-No Net" (solid, pour order 44): 21.25,27.5 23.65,27.5 23.65,26.85 23.8,26.7 27.5,26.7 27.5,25.8 23.85,25.8 23.85,26 23.6,26.25 21.25,26.25
GND on TOP "BOT-No Net" (solid, remove dead copper, pour order 38): 0,0 36,0 36,35.997 0,35.997 0,0
VDD_5V_IN on TOP "TOP-No Net" (solid, pour order 49): 26,25.6 27.575,25.6 27.725,25.75 27.725,26.75 27.575,26.9 26,26.9 26,27.5 28.8,27.5 28.8,23.25 27.45,23.25 27.45,24.5 27.25,24.7 26,24.7
FMU_VDD_3V3 on TOP "BOT-No Net" (solid, remove dead copper, pour order 42): 21.25,26 23.6,26 23.65,25.95 23.65,25.75 23.8,25.6 25.7,25.6 25.7,21.35 23.6,21.35 23.6,23.95 23.4,24.15 22.8,24.15 22.2,24.75 21.35,24.75 21.25,24.85
GND on 3 "BOT-No Net" (solid, remove dead copper, pour order 36): 0,36 36,36 36,-0.003 0,-0.003 0,35.95
VDD_5V_IN on 3 "BOT-No Net" (solid, remove dead copper, pour order 31): 18.6,22 27.85,22 27.85,22.35 27.6,22.35 27.35,22.6 27.35,22.9 27.6,23.15 28.25,23.15 28.25,24.65 28.6,25 28.6,27.25 23.85,32 17.25,32 17.15,31.9 17.15,30.6 17.25,30.5 19.25,30.5 21.75,28 21.75,23.5 21.25,23 18.6,23 18.5,22.9 18.5,22.1
GND on 2 "BOT-No Net" (solid, remove dead copper, pour order 37): 0,35.947 0,35.997 36,35.997 36,0 0,0 0,35.997
FMU_VDD_3V3 on 2 "BOT-No Net" (solid, remove dead copper, pour order 34): 17.25,21.5 21,21.5 21,14.5 20,13.5 20,8.5 17.25,8.5

## Keep-outs
Keep-Out Layer:
  lines w0.1: 0,-0.003 36,-0.003 36,35.997 0,35.997 0,-0.003

## Other copper
TOP:
  pour cut-out: 5.9,26 7.25,26 7.25,25.3 5.9,25.3
  pour cut-out: 25.4,13.3 25.7,13.3 25.7,9.65 25.4,9.65
  pour cut-out: 12,18.85 12.55,18.85 12.55,18.75 12.25,18.45 12.25,18.35 12,18.35
  pour cut-out: 15.85,18.85 16.4,18.85 16.4,17.9 16.25,17.9 16.25,18.15 16,18.15 15.85,18.3
  pour cut-out: 28.25,0 28.25,3.15 30.25,3.15 30.25,0
  pour cut-out: 22.5,8.7 23.05,8.7 23.05,6.55 22.45,6.55 22.45,8.65
  pour cut-out: 9.2,28.4 8.15,28.4 8.15,29.45 9.2,29.45
  pour cut-out: 9.45,28.95 10.85,28.95 10.85,27.75 9.45,27.75
  pour cut-out: 0,21.675 3.15,21.675 3.15,19.625 0,19.625
  pour cut-out: 8.12,16.97 8.15,17 11,17 11,10.75 8.75,10.75 8.75,16 8.12,16
  pour cut-out: 18.4,0 18.4,3.15 20.4,3.15 20.4,0
  pour cut-out: 0,7.7 3.15,7.7 3.15,5.65 0,5.65
  pour cut-out: 0,17.55 3.15,17.55 3.15,15.5 0,15.5
  pour cut-out: 0,30.3 3.15,30.3 3.15,28.3 0,28.3
  pour cut-out: 13.1,36 13.1,32.9 15.05,32.9 15.05,35.997
  pour cut-out: 5.75,32.9 7.7,32.9 7.7,35.997 7.747,36 5.75,36
  pour cut-out: 36,14.95 32.85,14.95 32.85,12.9 36,12.9
  pour cut-out: 36,7.6 32.85,7.6 32.85,5.55 36,5.55
  pour cut-out: 14.427,2.653 14.427,0.253 5.577,0.253 5.577,2.653 6.577,2.653 6.577,5.053 13.427,5.053 13.427,2.653
  pour cut-out: 6.25,4.75 6.25,6.25 4.75,6.25 4.75,4.75
  pour cut-out: 29.25,30.75 29.25,32.25 27.75,32.25 27.75,30.75
  pour cut-out: 36,29.9 33.9,29.9 33.9,15.3 36,15.3
  pour cut-out: 24.95,6.05 25.9,6.05 25.9,6.95 25.9,7.95 24.95,7.95
  pour cut-out: 26.75,11.05 27.2,11.05 27.2,9.45 26.75,9.45 26.75,8.25 29.6,8.25 29.6,9.45 29.35,9.45 29.35,11.05 29.6,11.05 29.6,13.65 26.75,13.65
  pour cut-out: 30.25,12.6 30.25,11.65 32.5,11.65 32.5,12.6
  pour cut-out: 27.1,28.4 27.1,30.65 25.7,30.65 25.7,28.4
  pour cut-out: 3.75,8.95 3.75,8 5.7,8 5.7,8.95
  pour cut-out: 7.8,11 7.8,10.05 6.9,10.05 6.9,11
  pour cut-out: 27,5.75 27.9,5.75 27.9,3.75 27,3.75
  pour cut-out: 13.45,23.9 15.05,23.9 15.05,21.5 13.45,21.5
  pour cut-out: 6.65,20.3 6.65,21.45 11.1,21.45 11.1,20.3
  pour cut-out: 24,20.8 27.2,20.8 27.2,19.55 23.75,19.55 23.75,20.55
  pour cut-out: 29.3,31.575 29.3,30.625 30.2,30.625 30.2,31.575
  pour cut-out: 8.05,30.25 8.05,32.25 9,32.25 9,30.25
  pour cut-out: 29.5,35.925 28.4,35.925 28.4,34.575 29.5,34.575
  pour cut-out: 14.9,30.025 14.9,30.975 14,30.975 14,30.025
  pour cut-out: 16.15,1.6 16.15,2.85 14.85,2.85 14.85,1.6
  pour cut-out: 3.75,22.95 5.75,22.95 5.75,22.05 3.75,22.05
  pour cut-out: 6.95,14.35 6.95,13.4 6.05,13.4 6.05,14.35
  pour cut-out: 17.75,4.35 16.9,4.35 16.9,5.15 17.75,5.15
  pour cut-out: 27.2,17.7 28.15,17.7 28.15,16.8 27.2,16.8
  pour cut-out: 7.65,6.15 7.65,5.25 6.7,5.25 6.7,6.15
  pour cut-out: 18.95,24.7 20.7,24.7 20.7,21.6 18.5,21.6 18.5,23.85 18.95,23.85
  pour cut-out: 23,16.25 26.5,16.25 26.5,13.85 23,13.85
3:
  pour cut-out: 9.95,20.15 7.052,20.15 7.05,17.2 9.95,17.2
  pour cut-out: 33.9,29.9 33.9,15.3 36,15.3 36,29.9
  pour cut-out: 10.35,11.35 6.65,11.35 6.65,7.65 10.35,7.65
2:
  pour cut-out: 9.6,10.65 7.3,10.65 7.3,8.6 9.6,8.6
  pour cut-out: 9,20 7.729,20 7.729,17.229 7.7,17.2 9,17.2
  pour cut-out: 36,29.9 33.9,29.9 33.9,15.3 36,15.3
BOT:
  pour cut-out: 26.4,19.15 26.4,17.85 27.85,17.85 27.85,19.15
  pour cut-out: 36,29.9 33.9,29.9 33.9,15.3 36,15.3
  pour cut-out: 13.9,15 16.05,15 16.05,13.1 13.9,13.1
  pour cut-out: 28.7,15 30.45,15 30.45,13.1 28.7,13.1
  pour cut-out: 28.7,5.8 30.45,5.8 30.45,3.1 28.7,3.1
  pour cut-out: 13.2,6.05 13.9,6.05 13.9,5.8 14.95,5.8 14.95,3.1 13.3,3.1 13.3,2.45 13.2,2.45
  pour cut-out: 0,28.3 3.15,28.3 3.15,30.3 0,30.3
  pour cut-out: 18.6,35.997 18.6,32.85 20.6,32.85 20.6,35.997
  pour cut-out: 28.4,35.997 28.4,32.85 30.45,32.85 30.45,35.997
  pour cut-out: 36,7.581 33.85,7.581 33.85,5.881 36,5.881
  pour cut-out: 36,15.15 33.85,15.15 33.85,13.45 36,13.45
  pour cut-out: 4.75,29.75 4.75,31.25 6.25,31.25 6.25,29.75
  pour cut-out: 29.75,5.75 29.75,7.25 31.25,7.25 31.25,5.75
  pour cut-out: 30.1,8.55 32.1,8.55 32.1,7.5 30.1,7.5
  pour cut-out: 14.2,0.55 13.1,0.55 12.9,0.35 11.1,0.35 10.8,0.65 10.8,1.05 11.1,1.35 12.85,1.35 12.9,1.4 12.9,2.45 14.2,2.45
  pour cut-out: 1.2,9.15 1.2,11.35 2.6,11.35 2.6,9.15
  pour cut-out: 7.9,6.35 7.9,5.45 6.95,5.45 6.95,6.35
  pour cut-out: 0,20.4 0,18.5 3.1,18.5 3.1,20.4
  pour cut-out: 4.9,17.25 4.9,18.75 4.2,18.75 4.2,17.25
  pour cut-out: 19.8,30 17.75,30 17.6,29.85 16.85,29.85 16.5,29.5 16.5,27 16.25,26.75 14.75,26.75 14.75,26.55 18.8,26.55 19.8,27.55
  pour cut-out: 5.75,27.95 3.75,27.95 3.75,27.05 5.75,27.05
  pour cut-out: 14.225,35.997 14.225,32.85 16.4,32.85 16.4,36
  pour cut-out: 5.625,35.997 5.625,32.85 7.675,32.85 7.675,35.997
  pour cut-out: 10.35,20.55 7.25,20.55 6.65,19.95 6.65,16.85 10.35,16.85
  pour cut-out: 10.5,11.55 6.45,11.55 6.45,7.5 10.5,7.5
  pour cut-out: 8.35,13.35 8.35,11.55 9.85,11.55 9.85,13.35
  pour cut-out: 9.45,16.85 7.45,16.85 7.45,14.55 9.45,14.55
  pour cut-out: 12.625,12.35 12.625,10.45 13.575,10.45 13.575,12.35
  pour cut-out: 14.8,21.95 16.9,21.95 16.9,21.1 14.8,21.1
  pour cut-out: 13,21.95 13,21.05 12.05,21.05 12.05,21.95
  pour cut-out: 12,20.75 13.9,20.75 13.9,20.55 14.1,20.55 14.1,20.75 14.8,20.75 14.8,20.45 16,20.45 16,16.75 14.1,16.75 14.1,16.95 13.9,16.95 13.9,16.75 13.6,16.75 13.6,16.95 13.4,16.95 13.4,16.75 12,16.75
  pour cut-out: 6.35,30.7 7.3,30.7 7.3,29.8 6.35,29.8
  pour cut-out: 25.85,15.9 25.85,13.4 25.5,13.4 25.5,15.9
  pour cut-out: 24.75,15.9 24.75,13.4 24.4,13.4 24.4,15.9
  pour cut-out: 5.8,17.3 4.2,17.3 4.2,14.95 5.8,14.95
  pour cut-out: 7.55,26.4 7.55,25.5 6.6,25.5 6.6,26.4
  pour cut-out: 20.95,32.3 20.45,31.8 20.45,30.25 25.55,30.25 25.55,28 26.3,28 26.3,26.4 27.7,26.4 27.7,28 28.2,28 28.2,32.3
  pour cut-out: 23.05,18.8 21.95,18.8 21.95,18.2 23.05,18.2

## Silkscreen, mask and mechanical layers (free items; w line width, h text height)
Top Overlay:
  circle w0.1: c2.75,33.25 r3
  circle w0.1: c33.25,33.25 r3
  circle w0.1: c33.25,2.75 r3
  circle w0.1: c2.75,2.75 r3
  circle w0.5: c27.876,28.75 r0.224
  region: 15.85,3 15.85,2.9 16.85,2.9 16.85,3
  region: 3.75,18.6 5,19.85 5,17.35
  region: 15.85,3.5 16.85,3.5 16.35,3
  region: 0.5,18.85 0.25,18.6 0.75,18.6
  lines w0.15: 16.4,25.15 16.4,27.35 ; 19.6,25.15 19.6,27.35 ; 22.425,25.175 22.425,27.35 ; 23.75,25.15 23.75,27.35 ; 27.15,8.15 29.35,8.15 ; 27.15,12.35 29.35,12.35
  lines w0.254: 17.95,29.5 17.95,28.25 27.25,28.25 27.25,29.5
  text "ESP8266" at 19.8,31.45 h0.7
  text "FRs" at 5.5,30 h1.75
  text "RC" at 6.85,27.5 h1.75 r90
  text "Pixracer" at 9.4,22.5 h1.75 r45
  text "DEC-05-2015-1700" at 11.5,17.5 h0.75
  text "TL2" at 6.1,15.1 h1.75 r90
  text "auav.co" at 8,11 h1.75 r90
  text "CAN" at 30,7.55 h1.75 r270
  text "C2T" at 8.2,6.5 h1.25
  text "TL1" at 20.75,6.05 h1.75 r180
  text "C2R" at 11.5,5 h1.25
Bottom Overlay:
  circle w0.1: c2.75,2.75 r3
  circle w0.1: c33.25,2.75 r3
  circle w0.1: c33.25,33.25 r3
  circle w0.1: c2.75,33.25 r3
  rectangle: 27.95,13.55 28.55,15.55
  text "G+S" at 31.45,30.05 h0.75
  text "BTBZ" at 17,29.7 h1.75
  text "PWR" at 20.35,29.7 h1.75
  text "6" at 28.75,28.7 h0.75
  text "5" at 28.75,26 h0.75
  text "4" at 28.75,23.55 h0.75
  text "C2" at 8.3,21.35 h0.5
  text "GPS" at 6.65,21.1 h1.75 r90
  text "C14" at 16.5,21.05 h0.5 r90
  text "3" at 28.75,20.95 h0.75
  text "2" at 28.75,18.4 h0.75
  text "C15" at 17,17.85 h0.5 r90
  text "D15" at 10.7,16.3 h0.5
  text "1" at 28.6,15.95 h0.75
  text "Pixracer" at 15.5,15.3 h1.5
  text "N.Arsov &" at 1.1,14.5 h1.5 r90
  text "P.Kocmoud" at 6,14.5 h1.45 r90
  text "V1" at 12.75,13.85 h1.5
  text "A6" at 9.15,13.5 h0.5
  text "E12" at 12.5,9 h0.5
  text "A7" at 12,8.25 h0.5
  text "E15" at 6.95,7.7 h0.5 r90
  text "A5" at 11.5,7.5 h0.5
Bottom Solder:
  circle w0.5: c38.15,27.6 r0.25
Mechanical 15:
  lines w2: -1,16.25 -1,-1 16.25,-1 ; -1,19.75 -1,37 ; -1,36.994 16.25,36.994 ; 19.75,-1 37,-1 ; 19.75,36.994 37,36.994 37,19.744 ; 37,-1.006 37,16.244